# Altium PCB PCB1.PcbDoc
Units mm, origin at the board's own origin, x right, y up, seen from the top; angles counter-clockwise.
Board outline 114.43 x 85.09 mm, 4 copper layers (Top Layer 1, Top Layer, Bottom Layer, Bottom Layer 1), stack 0.672 mm thick; 6 components, 2 nets, 34 pads, 0 vias.
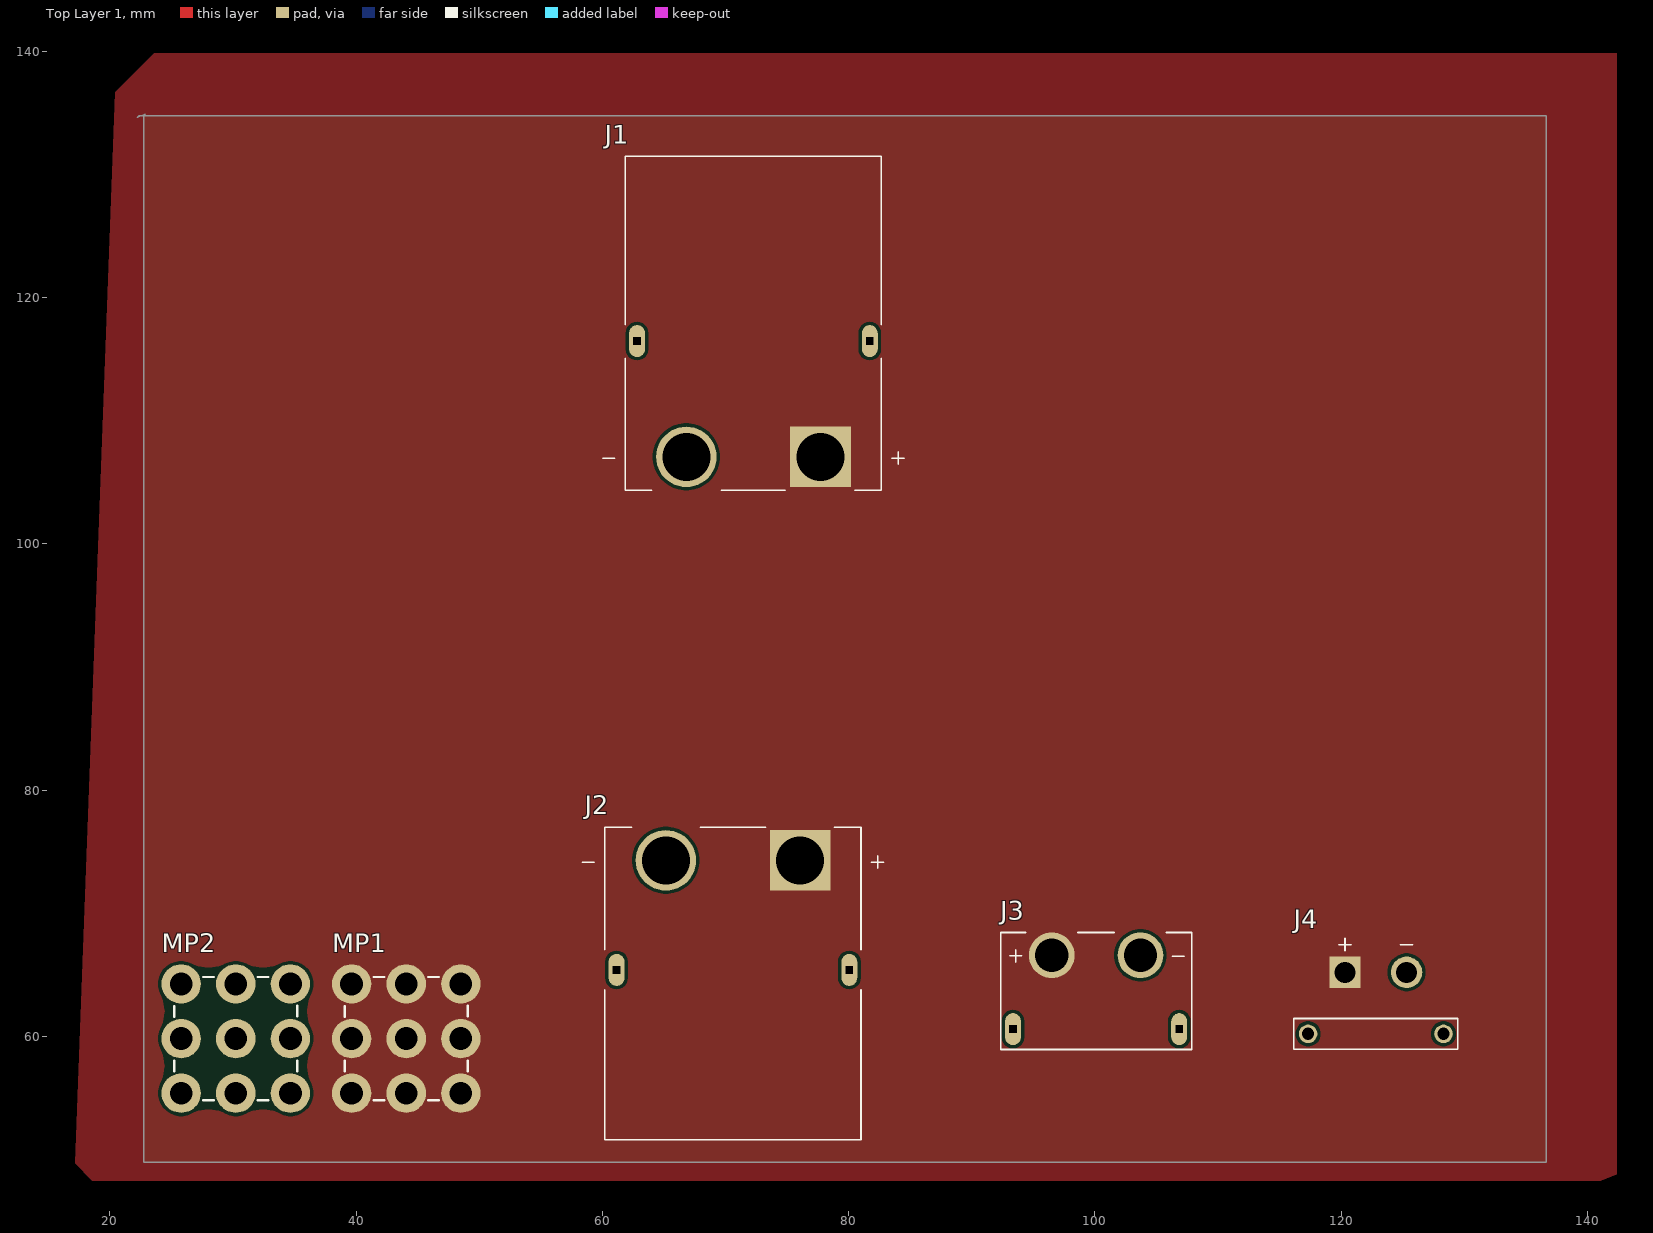
[diagram p0: Top Layer 1 view]
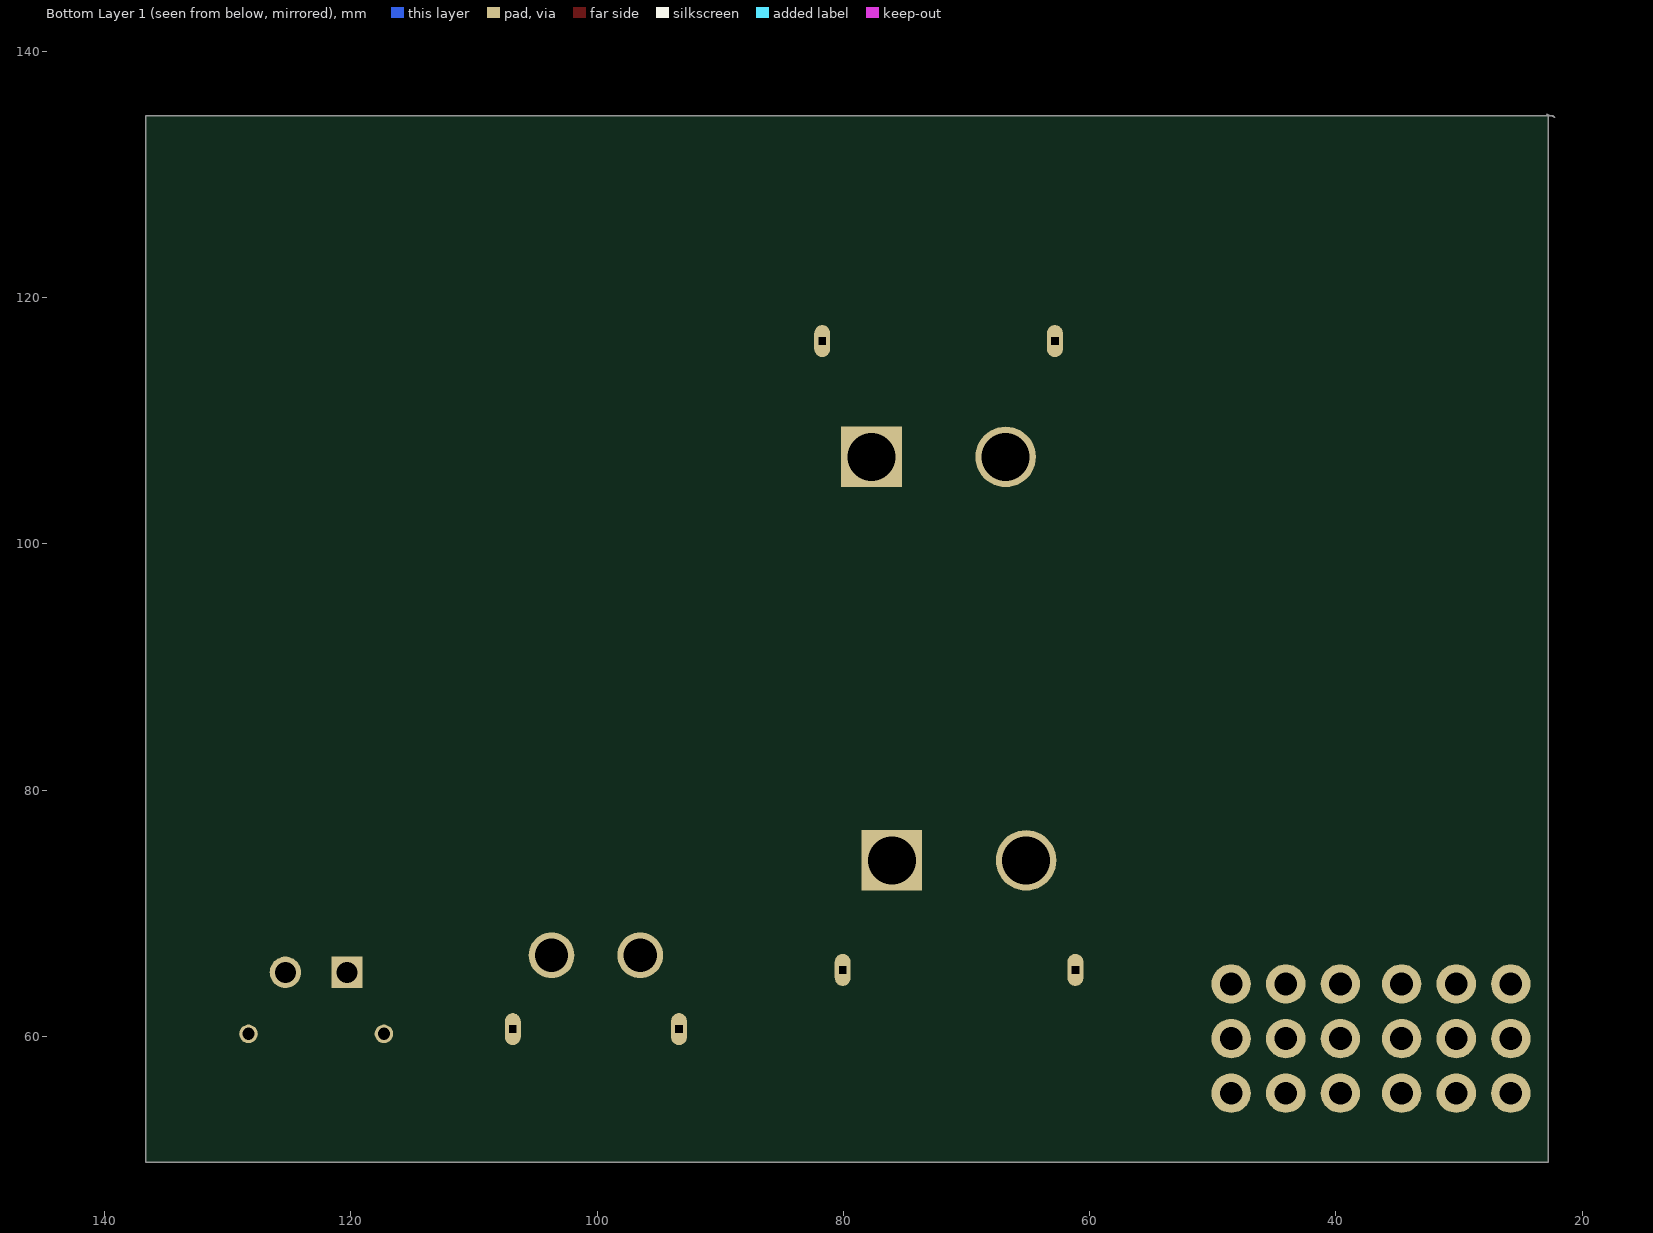
[diagram p1: Bottom Layer 1 view, seen from below]
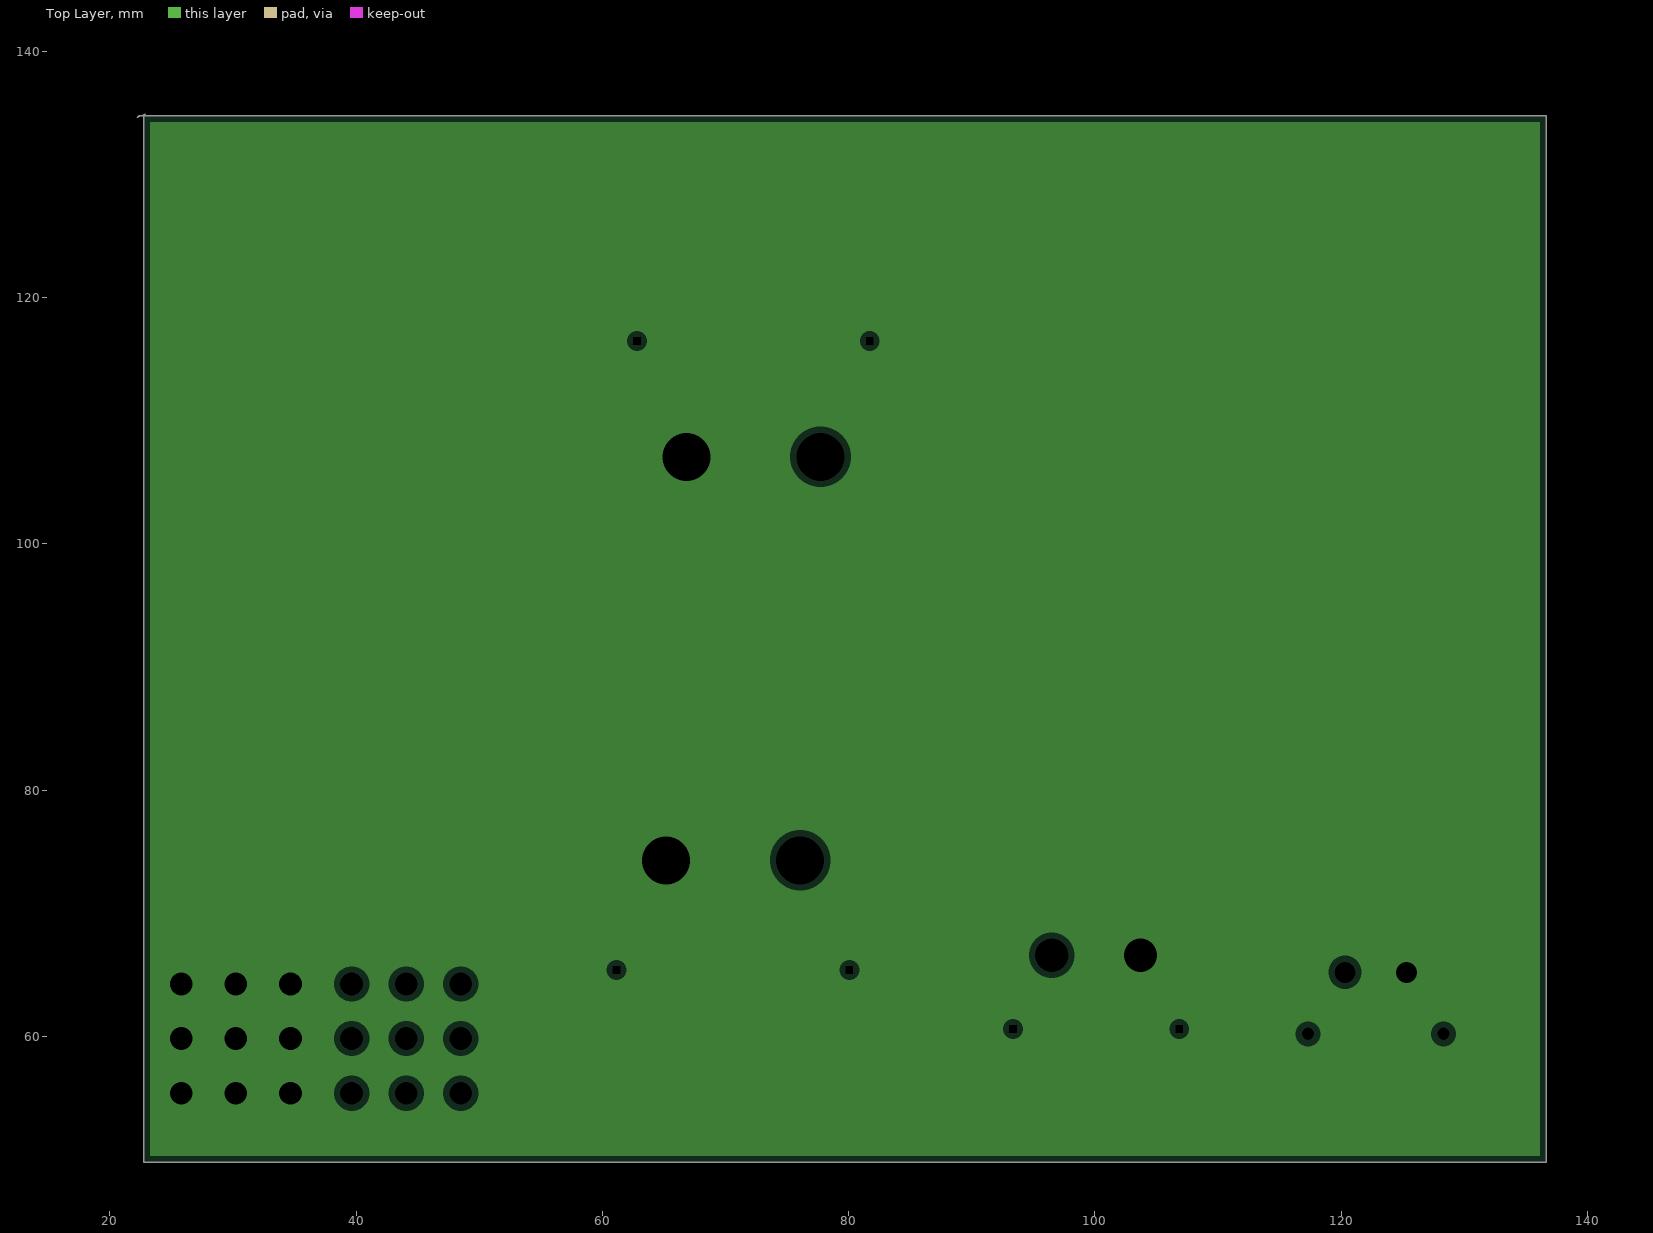
[diagram p2: Top Layer, clearances drawn from the general rule]
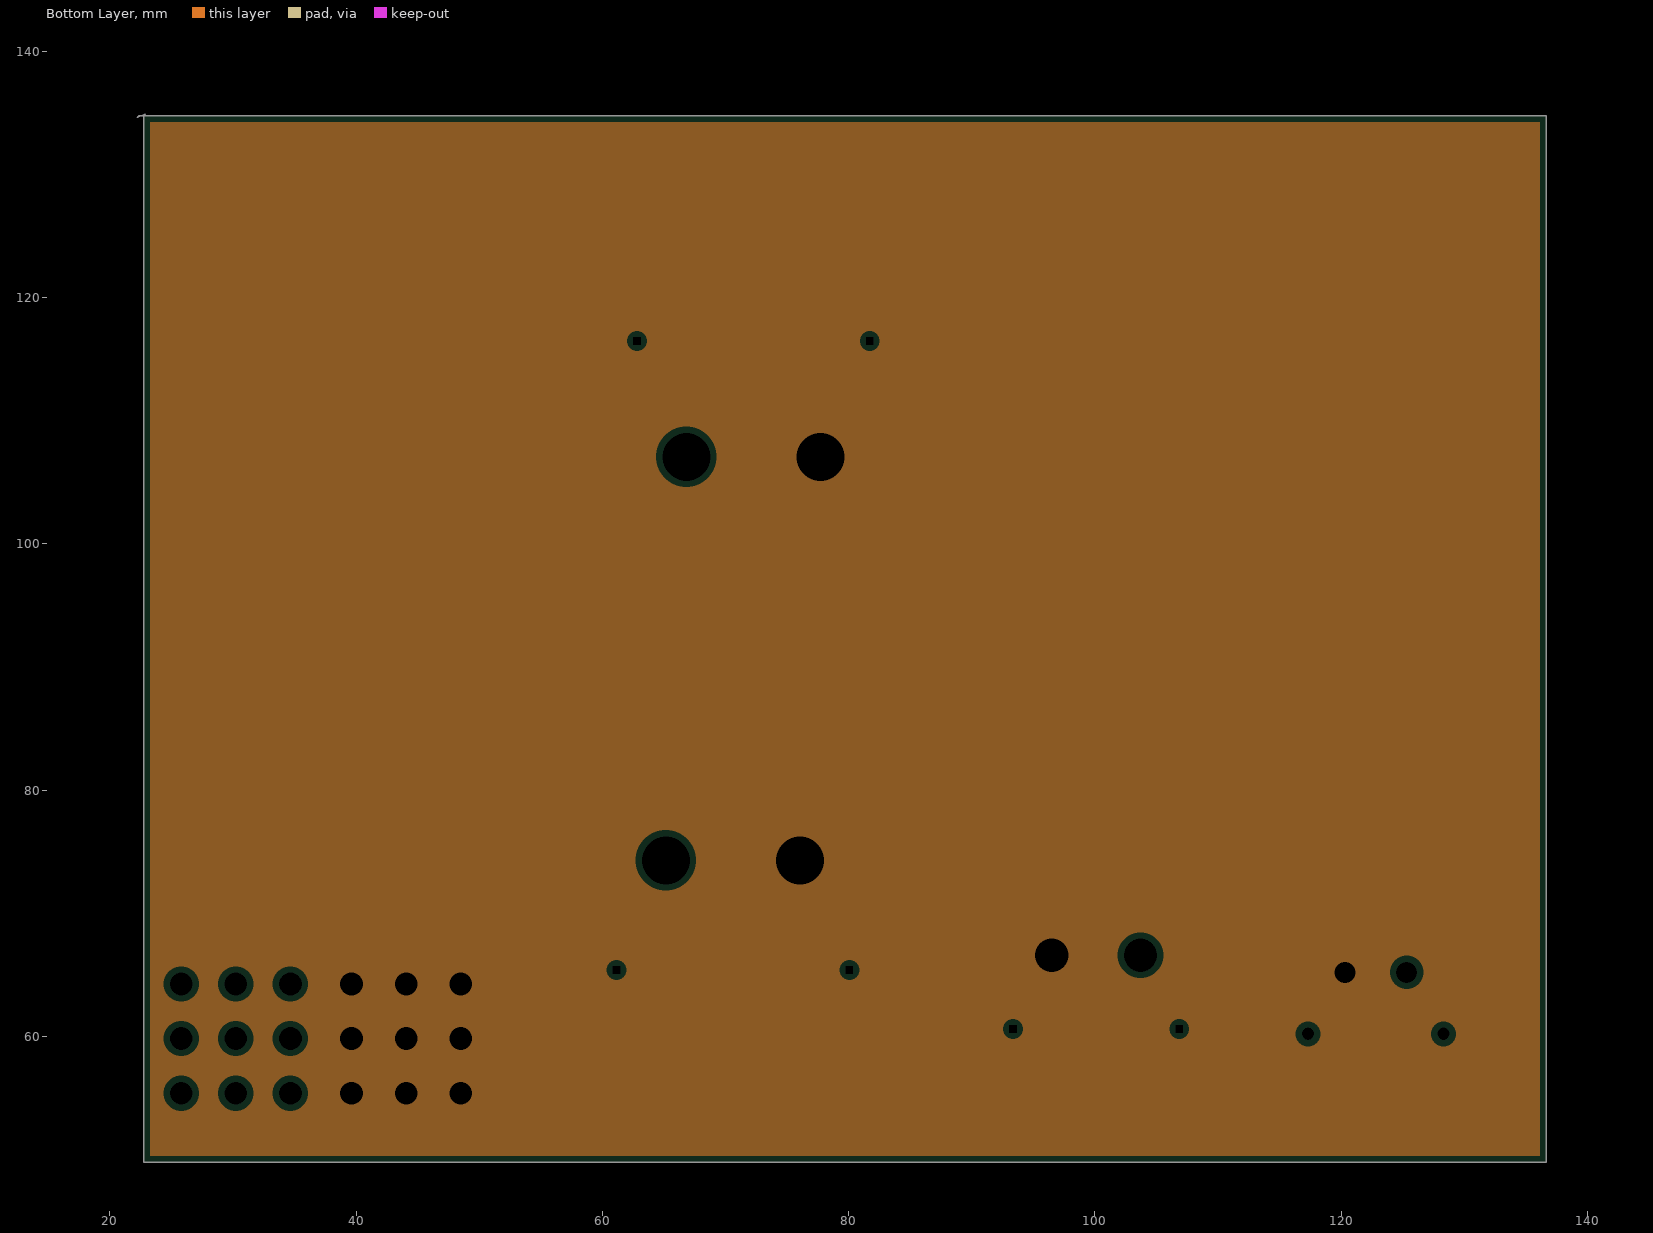
[diagram p3: Bottom Layer, clearances drawn from the general rule]
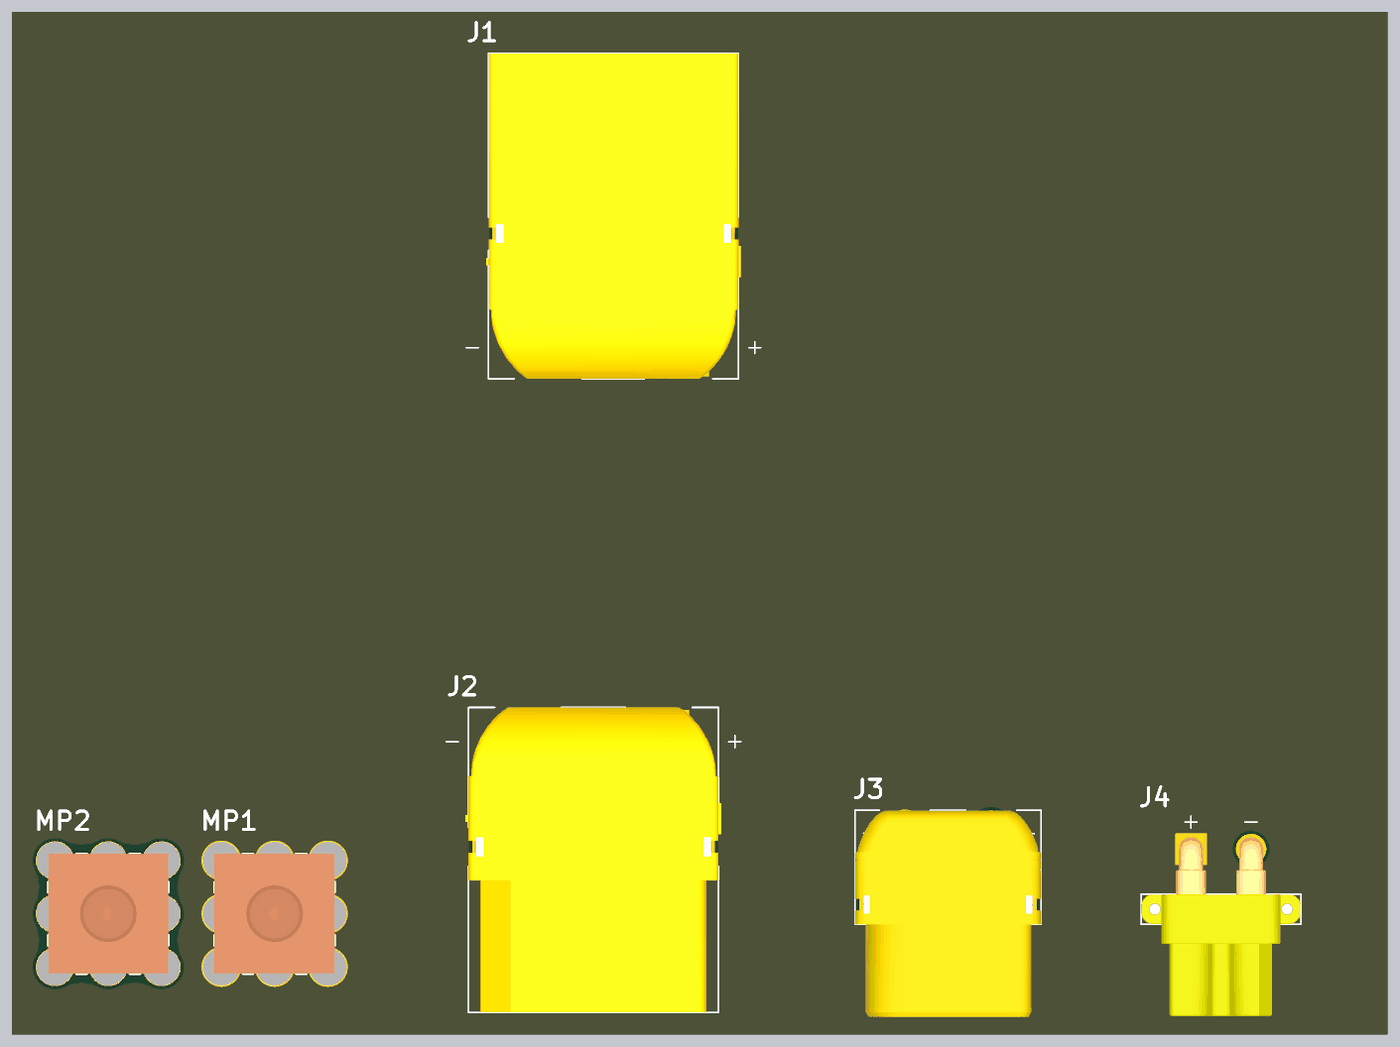
[diagram p4: 3D render of the assembled board from above, using the file's embedded part models]

## Layer stack, top to bottom
Top Solder: solder mask 0.0102, Solder Resist, Dk 3.5
Top Layer 1: signal copper 0.07
Dielectric 2: prepreg 0.0711, PP-006, Dk 4.1
Top Layer: plane copper 0.035, net GND
Dielectric 1: dielectric 0.32, FR-4, Dk 4.8
Bottom Layer: plane copper 0.035, net VDC_14S
Dielectric 3: prepreg 0.0711, PP-006, Dk 4.1
Bottom Layer 1: signal copper 0.07
Bottom Solder: solder mask 0.0102, Solder Resist, Dk 3.5

## Board outline
22.225,134.62 22.352,134.747 136.652,134.747 136.652,49.784 22.733,49.784 22.733,134.747 22.86,134.874

## Design rules (kind name [scope] priority, off if disabled: settings)
Clearance [All] p1: gap=0.254 ignorepadtopadclearanceinfootprint=FALSE
HoleSize [All] p1: absolutevalues=TRUE maxlimit=4.5 minlimit=0.5 maxpercent=80.000 minpercent=20.000
PlaneClearance [All] p1: clearance=0.508
PlaneConnect [All] p1: planeconnectstyle=Direct reliefexpansion=0.508 reliefentries=4 reliefconductorwidth=0.254 reliefairgap=0.254
PolygonConnect [All] p1: connectstyle=Direct reliefconductorwidth=0.254 reliefentries=4 polygonreliefangle="90 Angle" airgapwidth=0.254
RoutingVias [All] p1: holewidth=0.711 width=1.27 viastyle="Through Hole" minholewidth=0.711 minwidth=1.27 maxholewidth=0.711 maxwidth=1.27
SolderMaskExpansion [All] p1: expansion=0.05 istentingtop=FALSE
SupplyNets "Schematic Supply Nets_1" [InNet('VDC_14S')] p1: voltage=0.000
SupplyNets "Schematic Supply Nets" [InNet('GND')] p2: voltage=0.000
Width [All] p1: maxlimit=2.5 minlimit=2 preferedwidth=2
27 further rules are at their usual default settings.

## Components (designator, comment, footprint, x,y, rotation, side; value= is the part's Value field where it differs from the comment)
J1 "IN_XT90_14S" AMASS_XT90PW-M 72.263,116.459 r180 top
J2 "OUT1_XT90" AMASS_XT90PW-F 70.601,65.395 r0 top
J3 "OUT2_XT60" AMASS_XT60PW-F 100.095,66.579 r0 top
J4 "OUT3_XT30" AMASS_XT30PW-F 122.809,60.198 r180 top
MP1 "OUT4_M5_POS" 74650195 44.069,59.817 r0 top
MP2 "OUT4_M5_GND" 74650195 30.226,59.817 r0 top

## Footprints (in the part's own frame and the unit in brackets; to place one, negate y for a bottom-side part, rotate by r counter-clockwise, add the part's x,y. Pads: shape width x height; smd on the part's side, far side on the other; paste and mask are expansions set on the pad)
74650195 [mm] "REDCUBE THR with internal thread, M5x4mm, blind"
  round 3.2 hole 1.85: 1(-4.435,-4.435) 1(-4.435,0) 1(-4.435,4.435) 1(0,-4.435) 1(0,0) 1(0,4.435) 1(4.435,-4.435) 1(4.435,0) 1(4.435,4.435)
  silkscreen extent -5,-5 5,5, body extent -5,-5 5,5, height 7
AMASS_XT30PW-F [mm]
  round 2.55 hole 1.7: N(-2.5,-5)
  rect 2.55x2.55 / inner round 2.55 / far side rect 2.55x2.55 hole 1.7: P(2.5,-5)
  round 1.508 hole 1: S1(5.5,0) S2(-5.5,0)
  silkscreen extent -6.65,-7.75 6.65,1.25, body extent -6.65,-6 6.65,8.9, height 5
AMASS_XT60PW-F [mm]
  round 3.716 hole 2.7: 1(-3.6,0) 2(3.6,0)
  oval 1.3x2.6 hole 0.6 square: S1(-6.75,-6) S2(6.75,-6)
  silkscreen extent -7.75,-7.65 7.75,1.85, body extent -7.75,-15.35 7.75,1.85, height 8.4
AMASS_XT90PW-F [mm]
  round 4.916 hole 3.9: N(-5.45,8.9)
  rect 4.916x4.916 / inner round 4.916 / far side rect 4.916x4.916 hole 3.9: P(5.45,8.9)
  oval 1.3x2.6 hole 0.6 square: S1(9.45,0) S2(-9.45,0)
  silkscreen extent -12.25,-13.8 12.25,11.6, body extent -10.65,-13.8 10.65,11.6, height 10.3
AMASS_XT90PW-M [mm]
  round 4.916 hole 3.9: N(5.45,9.4)
  rect 4.916x4.916 / inner round 4.916 / far side rect 4.916x4.916 hole 3.9: P(-5.45,9.4)
  oval 1.3x2.6 hole 0.6 square: S1(-9.45,0) S2(9.45,0)
  silkscreen extent -12.25,-15 12.25,12.1, body extent -10.6,-15 10.6,12.1, height 10.3

## Part data
J1: library part XT90PW-M, "XT90 horizontal male"
J2: library part XT90F-PW
J3: library part XT60PW-F, "Socket DC Supply Connector Female", Package=Package, Availability="Not in stock", Check_prices=https://www.snapeda.com/parts/XT60PW-F/AMASS/view-part/?ref=eda, MF=AMASS, MP=XT60PW-F, Price=None, SnapEDA_Link=https://www.snapeda.com/parts/XT60PW-F/AMASS/view-part/?ref=snap
J4: library part XT30PW-F, "Socket; DC supply; XT30; female; PIN: 2; on PCBs; THT; yellow; 15A", Package=None, Check_prices=https://www.snapeda.com/parts/XT30PW-F/AMASS/view-part/?ref=eda, MF=amass, MP=XT30PW-F, SnapEDA_Link=https://www.snapeda.com/parts/XT30PW-F/AMASS/view-part/?ref=snap
MP1 MP2: library part CMP-03913-78872234-2, "Bush, Thr, Internal Blind-hole Thread, 10 Mm W X 7 Mm H, M5, 9 Pins /  / 74650195R", Current Rating=85A, Max Operating Temperature=150°C, Min Operating Temperature=-55°C, Height=4mm, Material=Brass, Number of Pins=9, Packaging="Tape and Reel", REACH SVHC=No, RoHS=Compliant, Width=10mm

## Nets (pads, with @x,y where several pads share a name; then routed paths per layer and width w, separated by ;. In a path a pad name is that pad's centre, name@x,y a point inside that pad or via, vN(x,y) a via of type N, cw(c..) or ccw(c..) an arc to the next point about the centre after c; other vN are vias at no path point)
GND: J1.N J2.N J3.2 J4.N MP2.1
VDC_14S: J1.P J2.P J3.1 J4.P MP1.1
pads on no net: J1.S1 J1.S2 J2.S1 J2.S2 J3.S1 J3.S2 J4.S1 J4.S2

## Polygon pours and split planes (outlines as drawn)
VDC_14S on Top Layer 1 "VDC_14S_L01_P000" (solid, pour order 0): 22.733,134.62 22.733,134.874 136.525,134.62 136.525,49.911 136.652,49.784 22.86,49.657
GND on Top Layer (split plane): 136.142,50.294 23.243,50.294 23.243,134.237 136.142,134.237
VDC_14S on Bottom Layer (split plane): 136.142,50.294 23.243,50.294 23.243,134.237 136.142,134.237